# Allegro board 980K2-260817_261117-1.brd

Outline 419.1 x 474.98 mm; copper layers: TOP, L02_GND, L03_DP, L04_GND, L05_DP, L06_GND, L07_VI, L08_GND, L09_VI, L10_GND, L11_VI, L12_GND, L13_VI, L14_GND, L15_5V, L16_5V, L17_C-BIT, L18_C-BIT, L19_GND, L20_VI, L21_GND, L22_VI, L23_GND, L24_VI, L25_GND, L26_VI, L27_GND, L28_DP, L29_GND, L30_DP, L31_GND, BOTTOM. Coordinates in mm from the lower left corner of the outline.

## Placement (name value [footprint] x y rotation side)
BC9  0.1U-50-X-S4-TDK  [C0402]  86.11 107.82 180 bottom
BR5  1K-1-S4  [R0402]  86.11 106.3 0 bottom
BR6  1K-1-S4  [R0402]  86.11 103.5 0 bottom
BR7  0-5-S6  [R0603]  83.44 106.3 180 bottom
BR8  0-5-S4  [R0402]  86.11 105.03 180 bottom
BR9  0-5-S4  [R0402]  86.11 102.24 180 bottom
BU1  AT24C512C-SSHM-T-SOIC8  [SO8_206X127MM]  91.06 105.66 180 bottom
C48  0.01U-100-X7R-S6-MU  [C0603]  147.57 273.87 90 bottom
C49  0.01U-100-X7R-S6-MU  [C0603]  136.27 268.99 270 bottom
C50  0.01U-100-X7R-S6-MU  [C0603]  142.28 268.54 270 bottom
C53  1U-16-X5R-S4-YA  [C0402]  142.24 261.62 270 bottom
C54  2.2U-16-X-S4-MU  [C0402]  136.53 261.62 270 bottom
C58  1U-16-X5R-S4-YA  [C0402]  142.11 257.68 270 bottom
C59  4.7U-100-X-SB-MU  [C1210]  140.59 246.51 270 bottom
C60  0.01U-100-X7R-S6-MU  [C0603]  147.01 259.72 0 bottom
C61  0.01U-100-X7R-S6-MU  [C0603]  156.88 264.78 180 bottom
C62  2.2U-16-X-S4-MU  [C0402]  157.07 259.72 0 bottom
C63  0.01U-100-X7R-S6-MU  [C0603]  157.73 261.82 90 bottom
C64  0.01U-100-X7R-S6-MU  [C0603]  156.88 267.82 180 bottom
C65  0.1U-25-X7R-S4-MU  [C0402]  157.73 271.37 90 bottom
C66  0.1U-25-X7R-S4-MU  [C0402]  152.65 276.61 180 bottom
C67  0.1U-25-X7R-S4-MU  [C0402]  150.24 278.13 180 bottom
C68  0.1U-25-X7R-S4-MU  [C0402]  147.83 282.7 180 bottom
C69  0.01U-100-X7R-S6-MU  [C0603]  151.96 259.72 0 bottom
C70  0.1U-25-X7R-S4-MU  [C0402]  122.8 294.89 180 bottom
C71  0.1U-25-X7R-S4-MU  [C0402]  129.42 294.89 180 bottom
C72  0.1U-25-X7R-S4-MU  [C0402]  158.75 227.33 0 bottom
C73  0.1U-25-X7R-S4-MU  [C0402]  153.67 227.33 0 bottom
C74  0.1U-25-X7R-S4-MU  [C0402]  157.73 273.91 90 bottom
CT1  47U-16-X5R-SB-MU  [C1210]  88.14 153.16 180 bottom
CT2  10U-16-X5R-S8-TY  [C0805]  108.2 164.59 90 bottom
CT3  22U-16-X-S8-MU  [C0805]  110.49 164.59 90 bottom
CT7  47U-16-X5R-SB-MU  [C1210]  88.14 132.84 180 bottom
CT8  10U-16-X5R-S8-TY  [C0805]  110.49 144.27 90 bottom
CT9  22U-16-X-S8-MU  [C0805]  108.2 144.27 90 bottom
F1  C1F8-0.25A-SA  [FUSE_1206_H1P05MM]  88.14 156.72 0 bottom
F2  C1F8-0.25A-SA  [FUSE_1206_H1P05MM]  88.14 136.4 0 bottom
FD1  -  [FD_040_V2]  95.25 123.19 0 top
FD2  -  [FD_040_V2]  323.85 123.19 0 top
FD3  -  [FD_040_V2]  323.85 351.79 0 top
FD4  -  [FD_040_V2]  95.25 351.79 0 top
FD5  -  [FD_040_V2]  323.85 123.19 180 bottom
FD6  -  [FD_040_V2]  95.25 123.19 180 bottom
FD7  -  [FD_040_V2]  95.25 351.79 180 bottom
FD8  -  [FD_040_V2]  323.85 351.79 180 bottom
FD9  -  [FD_040_V2]  19.05 123.19 0 top
FD10  -  [FD_040_V2]  400.05 123.19 0 top
FD11  -  [FD_040_V2]  400.05 351.79 0 top
FD12  -  [FD_040_V2]  19.05 351.79 0 top
FD13  -  [FD_040_V2]  400.05 123.19 180 bottom
FD14  -  [FD_040_V2]  19.05 123.19 180 bottom
FD15  -  [FD_040_V2]  19.05 351.79 180 bottom
FD16  -  [FD_040_V2]  400.05 351.79 180 bottom
K1  UA2-5NJ-A-V3  [RL_NECUA2_5V_V3]  138.43 290.63 270 bottom
K2  G3VM-201DR  [RL_G3VM201DR_200V]  144.15 277.5 0 bottom
K3  G3VM-201DR  [RL_G3VM201DR_200V]  134.49 273.18 90 bottom
K4  G3VM-201DR  [RL_G3VM201DR_200V]  144.15 291.47 0 bottom
K5  G3VM-51UR-5V-VSON4  [RL_G3VM_4P_VSON4]  139.95 268.99 0 bottom
K6  G3VM-51UR-5V-VSON4  [RL_G3VM_4P_VSON4]  139.95 266.19 0 bottom
K7  G3VM-51UR-5V-VSON4  [RL_G3VM_4P_VSON4]  139.95 264.16 0 bottom
K8  G3VM-51UR-5V-VSON4  [RL_G3VM_4P_VSON4]  139.95 261.62 0 bottom
K9  G3VM-51UR-5V-VSON4  [RL_G3VM_4P_VSON4]  134.24 261.62 0 bottom
K10  G3VM-51UR-5V-VSON4  [RL_G3VM_4P_VSON4]  135.38 264.16 0 bottom
K11  G3VM-51UR-5V-VSON4  [RL_G3VM_4P_VSON4]  143.76 257.3 90 bottom
K12  G3VM-51UR-5V-VSON4  [RL_G3VM_4P_VSON4]  143.76 252.48 90 bottom
K13  G3VM-51UR-5V-VSON4  [RL_G3VM_4P_VSON4]  143.76 246.51 90 bottom
K14  G3VM-51UR-5V-VSON4  [RL_G3VM_4P_VSON4]  146.56 252.48 90 bottom
K15  UA2-5NJ-A-V3  [RL_NECUA2_5V_V3]  135.25 242.75 270 bottom
K16  G3VM-51UR-5V-VSON4  [RL_G3VM_4P_VSON4]  146.56 257.3 90 bottom
K17  G3VM-51UR-5V-VSON4  [RL_G3VM_4P_VSON4]  148.72 257.3 90 bottom
K18  G3VM-51UR-5V-VSON4  [RL_G3VM_4P_VSON4]  148.72 252.48 90 bottom
K19  G3VM-51UR-5V-VSON4  [RL_G3VM_4P_VSON4]  151.51 257.3 90 bottom
K20  G3VM-51UR-5V-VSON4  [RL_G3VM_4P_VSON4]  151.51 252.48 90 bottom
K21  G3VM-51UR-5V-VSON4  [RL_G3VM_4P_VSON4]  153.67 257.3 90 bottom
K22  G3VM-51UR-5V-VSON4  [RL_G3VM_4P_VSON4]  153.67 252.48 90 bottom
K23  UA2-5NJ-A-V3  [RL_NECUA2_5V_V3]  152.78 242.75 270 bottom
K24  UA2-5NJ-A-V3  [RL_NECUA2_5V_V3]  161.04 242.75 270 bottom
K25  G3VM-51UR-5V-VSON4  [RL_G3VM_4P_VSON4]  156.97 257.3 90 bottom
K26  G3VM-51UR-5V-VSON4  [RL_G3VM_4P_VSON4]  156.97 252.48 90 bottom
K27  G3VM-51UR-5V-VSON4  [RL_G3VM_4P_VSON4]  160.15 261.37 180 bottom
K28  G3VM-51UR-5V-VSON4  [RL_G3VM_4P_VSON4]  164.72 261.37 180 bottom
K29  G3VM-51UR-5V-VSON4  [RL_G3VM_4P_VSON4]  169.29 261.37 180 bottom
K30  G3VM-51UR-5V-VSON4  [RL_G3VM_4P_VSON4]  160.15 265.18 180 bottom
K31  G3VM-51UR-5V-VSON4  [RL_G3VM_4P_VSON4]  164.72 265.18 180 bottom
K32  G3VM-51UR-5V-VSON4  [RL_G3VM_4P_VSON4]  169.29 265.18 180 bottom
K33  G3VM-51UR-5V-VSON4  [RL_G3VM_4P_VSON4]  160.15 268.22 180 bottom
K34  G3VM-51UR-5V-VSON4  [RL_G3VM_4P_VSON4]  164.72 268.22 180 bottom
K35  G3VM-51UR-5V-VSON4  [RL_G3VM_4P_VSON4]  169.29 268.22 180 bottom
K36  G3VM-51UR-5V-VSON4  [RL_G3VM_4P_VSON4]  160.15 271.27 180 bottom
K37  G3VM-51UR-5V-VSON4  [RL_G3VM_4P_VSON4]  164.72 271.27 180 bottom
K38  G3VM-51UR-5V-VSON4  [RL_G3VM_4P_VSON4]  160.15 273.81 180 bottom
K39  G3VM-51UR-5V-VSON4  [RL_G3VM_4P_VSON4]  164.72 273.81 180 bottom
K40  G3VM-51UR-5V-VSON4  [RL_G3VM_4P_VSON4]  155.58 273.05 270 bottom
K41  G3VM-51UR-5V-VSON4  [RL_G3VM_4P_VSON4]  155.58 277.62 270 bottom
K42  G3VM-51UR-5V-VSON4  [RL_G3VM_4P_VSON4]  155.58 282.19 270 bottom
K43  G3VM-51UR-5V-VSON4  [RL_G3VM_4P_VSON4]  152.65 273.05 270 bottom
K44  G3VM-51UR-5V-VSON4  [RL_G3VM_4P_VSON4]  152.65 278.89 270 bottom
K45  G3VM-51UR-5V-VSON4  [RL_G3VM_4P_VSON4]  152.65 283.46 270 bottom
K46  G3VM-51UR-5V-VSON4  [RL_G3VM_4P_VSON4]  150.24 274.57 270 bottom
K47  G3VM-51UR-5V-VSON4  [RL_G3VM_4P_VSON4]  150.24 280.42 270 bottom
K48  G3VM-51UR-5V-VSON4  [RL_G3VM_4P_VSON4]  150.24 284.99 270 bottom
K49  G3VM-51UR-5V-VSON4  [RL_G3VM_4P_VSON4]  147.83 284.99 270 bottom
K50  G3VM-51UR-5V-VSON4  [RL_G3VM_4P_VSON4]  147.83 279.15 270 bottom
K51  G3VM-51UR-5V-VSON4  [RL_G3VM_4P_VSON4]  148.72 246.51 270 bottom
K52  G3VM-51UR-5V-VSON4  [RL_G3VM_4P_VSON4]  148.72 241.17 90 bottom
K53  G3VM-51UR-5V-VSON4  [RL_G3VM_4P_VSON4]  156.97 246.51 270 bottom
K54  G3VM-51UR-5V-VSON4  [RL_G3VM_4P_VSON4]  156.97 241.17 90 bottom
K55  G3VM-51UR-5V-VSON4  [RL_G3VM_4P_VSON4]  123.44 292.35 0 bottom
K56  G3VM-201DR  [RL_G3VM201DR_200V]  128.4 288.67 90 bottom
K57  G3VM-51UR-5V-VSON4  [RL_G3VM_4P_VSON4]  158.12 234.57 270 bottom
K58  G3VM-51UR-5V-VSON4  [RL_G3VM_4P_VSON4]  156.08 234.57 270 bottom
K59  G3VM-51UR-5V-VSON4  [RL_G3VM_4P_VSON4]  153.04 234.57 270 bottom
K60  G3VM-51UR-5V-VSON4  [RL_G3VM_4P_VSON4]  151 234.57 270 bottom
K61  G3VM-51UR-5V-VSON4  [RL_G3VM_4P_VSON4]  130.05 292.35 0 bottom
LD1  LDG-2-S6  [LED_0603]  88.91 165.19 0 top
LD3  LDG-2-S6  [LED_0603]  88.91 144.87 0 top
LT1  L10U-16A-S16.5X15.5-PU  [IND_16P5X15P5MM]  98.93 156.59 0 bottom
LT3  L10U-16A-S16.5X15.5-PU  [IND_16P5X15P5MM]  98.93 136.27 0 bottom
M1  PG_LTXDX_F_X1_OUTLINE_TD_V2  [PG_LTXDX_F_X1_OUTLINE_TD_COHU]  209.55 237.49 0 top
NOREF  -  []  239.27 200.97 90 top
NOREF#2  -  []  139.08 208.59 0 top
NOREF#3  -  []  234.33 207.37 90 top
NOREF#4  -  []  276.1 280.99 90 top
NOREF#5  -  []  155.97 21.69 90 top
NOREF#6  -  []  204.95 264.23 90 top
NOREF#7  -  []  233.6 276.55 0 top
NOREF#8  -  []  253.62 289.09 90 top
NOREF#9  -  []  237.92 250.01 0 top
NOREF#10  -  []  248.42 204.78 90 top
NOREF#11  -  []  193.18 217.69 90 top
NOREF#12  -  []  148.78 228.49 0 top
NOREF#13  -  []  265.09 257.49 90 top
NOREF#14  -  []  147.43 224.11 90 top
NOREF#15  -  []  132.55 250.49 90 top
NOREF#16  -  []  201.75 266.13 0 top
NOREF#17  -  []  232.63 233.69 0 top
NOREF#18  -  []  273.39 193.03 90 top
NOREF#19  -  []  226.96 251.6 90 top
NOREF#20  -  []  199.27 274.21 0 top
NOREF#21  -  []  239.22 179.57 90 top
NOREF#22  -  []  230.97 195.7 90 top
NOREF#23  -  []  251.21 294.24 90 top
NOREF#24  -  []  189.72 286.19 0 top
NOREF#25  -  []  269.84 284.11 0 top
NOREF#26  -  []  236.57 242.05 0 top
NOREF#27  -  []  148.99 180.62 0 top
NOREF#28  -  []  201.75 209.17 0 top
NOREF#29  -  []  191.87 396.29 0 top
NOREF#30  -  []  276.57 242.05 0 top
NOREF#31  -  []  189.84 219.54 90 top
NOREF#32  -  []  218.83 292.23 0 top
NOREF#33  -  []  192.25 212.18 90 top
NOREF#34  -  []  122.85 237.22 0 top
NOREF#35  -  []  226.16 200.17 90 top
NOREF#36  -  []  233.76 190.88 90 top
NOREF#37  -  []  267.43 218.27 90 top
NOREF#38  -  []  189.84 213.7 0 top
NOREF#39  -  []  192.25 218.02 90 top
NOREF#40  -  []  206.32 272.22 0 top
NOREF#41  -  []  275.68 233.69 90 top
NOREF#42  -  []  239.65 212.56 0 top
NOREF#43  -  []  184.04 251.93 0 top
NOREF#44  -  []  254.09 264.23 90 top
NOREF#45  -  []  193.03 172.1 0 top
NOREF#46  -  []  228.32 245.63 90 top
NOREF#47  -  []  189.72 226.19 0 top
NOREF#48  -  []  204.95 260.42 90 top
NOREF#49  -  []  185.61 257.6 0 top
NOREF#50  -  []  188.99 191.93 0 top
NOREF#51  -  []  148.32 258.18 0 top
NOREF#52  -  []  273.83 172.21 90 top
NOREF#53  -  []  170.89 202.32 0 top
NOREF#54  -  []  273.18 282.26 90 top
NOREF#55  -  []  132.26 248.4 0 top
NOREF#56  -  []  171.22 234.89 90 top
NOREF#57  -  []  233.27 198.18 0 top
NOREF#58  -  []  268.99 180.62 0 top
NOREF#59  -  []  157.8 14.59 90 top
NOREF#60  -  []  208.42 204.78 90 top
NOREF#61  -  []  197.25 251.93 0 top
NOREF#62  -  []  149.29 282.02 90 top
NOREF#63  -  []  173.62 229.09 90 top
NOREF#64  -  []  233.18 222.26 90 top
NOREF#65  -  []  151.98 226.59 90 top
NOREF#66  -  []  187.05 209.24 0 top
NOREF#67  -  []  199.24 244.35 0 top
NOREF#68  -  []  235.15 236.17 90 top
NOREF#69  -  []  261.59 248.12 0 top
NOREF#70  -  []  248.42 261.77 0 top
NOREF#71  -  []  244.64 241.15 90 top
NOREF#72  -  []  253.64 299.09 0 top
NOREF#73  -  []  243.4 236.38 0 top
NOREF#74  -  []  180.95 261.55 90 top
NOREF#75  -  []  260.43 284.38 90 top
NOREF#76  -  []  192.51 235.77 0 top
NOREF#77  -  []  210.02 214.45 0 top
NOREF#78  -  []  239.44 179.15 0 top
NOREF#79  -  []  204.95 272.86 90 top
NOREF#80  -  []  218.95 266.12 0 top
NOREF#81  -  []  228.19 187.71 0 top
NOREF#82  -  []  181.94 389.27 90 top
NOREF#83  -  []  109.54 14.59 90 top
NOREF#84  -  []  230.48 175.77 0 top
NOREF#85  -  []  288.39 396.29 0 top
NOREF#86  -  []  150.77 223.79 90 top
NOREF#87  -  []  149.24 185.31 90 top
NOREF#88  -  []  146.28 193.03 90 top
NOREF#89  -  []  153.95 251.93 0 top
NOREF#90  -  []  179.08 201.22 0 top
NOREF#91  -  []  249.05 232.28 0 top
NOREF#92  -  []  228.78 244.35 0 top
NOREF#93  -  []  182.87 213.02 0 top
NOREF#94  -  []  149.84 279.54 90 top
NOREF#95  -  []  274.07 251.6 90 top
NOREF#96  -  []  221.03 267.69 90 top
NOREF#97  -  []  205.38 226.23 0 top
NOREF#98  -  []  178.85 241.15 90 top
NOREF#99  -  []  171.25 244.35 0 top
NOREF#100  -  []  146.43 222.5 90 top
NOREF#101  -  []  278.13 389.27 90 top
NOREF#102  -  []  148.19 247.71 0 top
NOREF#103  -  []  151.7 274.65 90 top
NOREF#104  -  []  323.77 454.29 90 top
NOREF#105  -  []  230.56 252.78 0 top
NOREF#106  -  []  135.15 265.24 90 top
NOREF#107  -  []  211.05 185.49 90 top
NOREF#108  -  []  180.83 263.76 90 top
NOREF#109  -  []  196.52 221.12 0 top
NOREF#110  -  []  198.47 82.65 0 top
NOREF#111  -  []  191.19 223.92 0 top
NOREF#112  -  []  254.09 267.27 90 top
NOREF#113  -  []  243.84 205.58 0 top
NOREF#114  -  []  233.83 232.21 90 top
NOREF#115  -  []  263.36 258.18 0 top
NOREF#116  -  []  162.2 178.35 0 top
NOREF#117  -  []  180.95 208.91 90 top
NOREF#118  -  []  243.84 264.78 90 top
NOREF#119  -  []  254.09 200.42 90 top
NOREF#120  -  []  148.44 257.85 90 top
NOREF#121  -  []  187.43 284.11 90 top
NOREF#122  -  []  231.53 233.37 90 top
NOREF#123  -  []  141.55 205.11 90 top
NOREF#124  -  []  231.24 197.85 90 top
NOREF#125  -  []  242.44 232.28 0 top
NOREF#126  -  []  226.16 286.14 90 top
NOREF#127  -  []  278.64 173.37 90 top
NOREF#128  -  []  268.78 244.35 0 top
NOREF#129  -  []  191.79 191.93 0 top
NOREF#130  -  []  146.28 197.85 90 top
NOREF#131  -  []  159.4 207.5 90 top
NOREF#132  -  []  288.42 208.62 0 top
NOREF#133  -  []  269.72 221.62 0 top
NOREF#134  -  []  264.16 191.6 90 top
NOREF#135  -  []  157.92 190.01 0 top
NOREF#136  -  []  163.84 268.62 0 top
NOREF#137  -  []  147.05 269.24 0 top
NOREF#138  -  []  178.95 266.12 0 top
NOREF#139  -  []  155.17 216.75 90 top
NOREF#140  -  []  302.26 14.59 90 top
NOREF#141  -  []  149.72 275.77 0 top
NOREF#142  -  []  189.84 279.54 90 top
NOREF#143  -  []  155.17 221.32 0 top
NOREF#144  -  []  250.89 269.17 0 top
NOREF#145  -  []  216.98 205.11 90 top
NOREF#146  -  []  218.35 207.01 0 top
NOREF#147  -  []  183.36 253.35 0 top
NOREF#148  -  []  279.24 184.35 0 top
NOREF#149  -  []  170.92 231.95 90 top
NOREF#150  -  []  203.84 207.82 90 top
NOREF#151  -  []  197.59 235.77 0 top
NOREF#152  -  []  276.1 276.42 90 top
NOREF#153  -  []  185.09 197.49 90 top
NOREF#154  -  []  166.32 262.32 0 top
NOREF#155  -  []  235.68 173.69 90 top
NOREF#156  -  []  268.44 257.85 90 top
NOREF#157  -  []  229.72 215.77 0 top
NOREF#158  -  []  261.59 294.14 0 top
NOREF#159  -  []  238.91 232.21 90 top
NOREF#160  -  []  236.33 167.9 90 top
NOREF#161  -  []  289.52 267.27 90 top
NOREF#162  -  []  159.4 200.64 90 top
NOREF#163  -  []  142.88 273.02 0 top
NOREF#164  -  []  149.29 289.79 0 top
NOREF#165  -  []  228.78 184.35 0 top
NOREF#166  -  []  139.55 240.49 90 top
NOREF#167  -  []  230.6 173.69 0 top
NOREF#168  -  []  275.15 236.17 90 top
NOREF#169  -  []  191.11 200.17 90 top
NOREF#170  -  []  243.84 210.87 90 top
NOREF#171  -  []  229.12 251.6 90 top
NOREF#172  -  []  197.71 233.69 0 top
NOREF#173  -  []  226.01 190.88 90 top
NOREF#174  -  []  177.25 236.5 90 top
NOREF#175  -  []  157.92 236.37 90 top
NOREF#176  -  []  143.49 253.03 90 top
NOREF#177  -  []  88.14 155.19 0 top
NOREF#178  -  []  231.24 253.03 90 top
NOREF#179  -  []  196.33 227.9 90 top
NOREF#180  -  []  277.25 196.75 0 top
NOREF#181  -  []  191.46 167 0 top
NOREF#182  -  []  192.25 212.18 0 top
NOREF#183  -  []  270.6 233.69 0 top
NOREF#184  -  []  197.37 251.6 90 top
NOREF#185  -  []  212.55 284.49 0 top
NOREF#186  -  []  224.16 251.6 90 top
NOREF#187  -  []  193.6 286.96 0 top
NOREF#188  -  []  198.91 172.21 90 top
NOREF#189  -  []  259.08 208.59 0 top
NOREF#190  -  []  135.15 268.04 90 top
NOREF#191  -  []  244.95 260.42 90 top
NOREF#192  -  []  261.85 292.49 0 top
NOREF#193  -  []  277.71 233.69 0 top
NOREF#194  -  []  197.59 175.77 0 top
NOREF#195  -  []  220.83 203.76 90 top
NOREF#196  -  []  225.61 197.6 0 top
NOREF#197  -  []  218.95 208.91 0 top
NOREF#198  -  []  136.5 285.91 90 top
NOREF#199  -  []  266.96 196.43 90 top
NOREF#200  -  []  161.12 188.11 90 top
NOREF#201  -  []  267.05 269.24 0 top
NOREF#202  -  []  209.55 237.49 0 top
NOREF#203  -  []  193.76 190.88 90 top
NOREF#204  -  []  275.17 276.75 0 top
NOREF#205  -  []  244.61 234.24 90 top
NOREF#206  -  []  253.62 229.09 90 top
NOREF#207  -  []  279.27 201.77 0 top
NOREF#208  -  []  276.52 221.12 0 top
NOREF#209  -  []  232.72 257.6 0 top
NOREF#210  -  []  237.37 191.6 90 top
NOREF#211  -  []  293.02 392.33 90 top
NOREF#212  -  []  221.59 308.11 0 top
NOREF#213  -  []  237.04 244.35 0 top
NOREF#214  -  []  186.01 195.7 90 top
NOREF#215  -  []  226.16 260.17 90 top
NOREF#216  -  []  264.24 18.69 0 top
NOREF#217  -  []  235.58 202.67 90 top
NOREF#218  -  []  191.79 196.75 0 top
NOREF#219  -  []  186.16 200.17 90 top
NOREF#220  -  []  270.6 233.69 90 top
NOREF#221  -  []  195.58 202.67 90 top
NOREF#222  -  []  215.24 261.55 90 top
NOREF#223  -  []  194.39 222.02 90 top
NOREF#224  -  []  228.32 198.18 0 top
NOREF#225  -  []  154.07 191.6 90 top
NOREF#226  -  []  188.99 180.62 0 top
NOREF#227  -  []  170.89 269.17 0 top
NOREF#228  -  []  139.08 263.76 0 top
NOREF#229  -  []  124.55 148.49 90 top
NOREF#230  -  []  279.4 208.95 0 top
NOREF#231  -  []  156.7 193.03 90 top
NOREF#232  -  []  227.43 278.27 0 top
NOREF#233  -  []  192.13 280.09 0 top
NOREF#234  -  []  156.57 185.63 90 top
NOREF#235  -  []  130.58 263.21 0 top
NOREF#236  -  []  235.96 168.6 90 top
NOREF#237  -  []  269.67 190.01 0 top
NOREF#238  -  []  318.12 17.15 0 top
NOREF#239  -  []  235.17 276.75 90 top
NOREF#240  -  []  149.12 196.43 90 top
NOREF#241  -  []  258.35 267.01 0 top
NOREF#242  -  []  164.95 260.42 90 top
NOREF#243  -  []  170.89 206.13 0 top
NOREF#244  -  []  168.42 267.82 90 top
NOREF#245  -  []  149.84 273.7 0 top
NOREF#246  -  []  188.32 258.18 0 top
NOREF#247  -  []  243.97 212 0 top
NOREF#248  -  []  245.73 17.15 90 top
NOREF#249  -  []  251.05 232.28 90 top
NOREF#250  -  []  156.1 216.42 90 top
NOREF#251  -  []  273.98 238.07 0 top
NOREF#252  -  []  227.8 265.39 90 top
NOREF#253  -  []  236.52 221.12 0 top
NOREF#254  -  []  238.11 232.1 0 top
NOREF#255  -  []  243.84 274.21 0 top
NOREF#256  -  []  191.76 167.33 0 top
NOREF#257  -  []  141.55 202.57 90 top
NOREF#258  -  []  222.81 186.81 0 top
NOREF#259  -  []  199.27 264.78 90 top
NOREF#260  -  []  230.56 192.78 0 top
NOREF#261  -  []  233.03 172.1 0 top
NOREF#262  -  []  174.04 210.63 90 top
NOREF#263  -  []  144.04 191.93 0 top
NOREF#264  -  []  258.35 204.47 0 top
NOREF#265  -  []  260.83 261.22 90 top
NOREF#266  -  []  192.13 220.09 0 top
NOREF#267  -  []  187.8 209.99 0 top
NOREF#268  -  []  229.84 213.7 0 top
NOREF#269  -  []  218.83 232.23 0 top
NOREF#270  -  []  152.51 175.77 0 top
NOREF#271  -  []  268.99 251.93 0 top
NOREF#272  -  []  136.5 285.91 0 top
NOREF#273  -  []  226.7 283.04 90 top
NOREF#274  -  []  141.6 248.12 0 top
NOREF#275  -  []  148.35 277.95 90 top
NOREF#276  -  []  277.25 191.93 0 top
NOREF#277  -  []  148.81 190.88 90 top
NOREF#278  -  []  150.97 195.7 90 top
NOREF#279  -  []  151.7 277.85 0 top
NOREF#280  -  []  149.12 180.3 90 top
NOREF#281  -  []  227.77 197.6 0 top
NOREF#282  -  []  214.09 260.42 90 top
NOREF#283  -  []  231.98 226.59 90 top
NOREF#284  -  []  243.84 261.77 0 top
NOREF#285  -  []  152.25 212.18 90 top
NOREF#286  -  []  191.98 286.59 90 top
NOREF#287  -  []  274.07 196.43 90 top
NOREF#288  -  []  122.44 292.28 0 top
NOREF#289  -  []  123.92 229.94 0 top
NOREF#290  -  []  149.84 224.11 90 top
NOREF#291  -  []  235.49 168.7 90 top
NOREF#292  -  []  237.37 256.43 90 top
NOREF#293  -  []  231.98 286.59 90 top
NOREF#294  -  []  231.73 232.54 0 top
NOREF#295  -  []  188.32 198.18 0 top
NOREF#296  -  []  265.41 213.02 90 top
NOREF#297  -  []  228.44 253.03 90 top
NOREF#298  -  []  243.97 213.09 90 top
NOREF#299  -  []  186.16 272.17 90 top
NOREF#300  -  []  261.59 234.15 0 top
NOREF#301  -  []  230.97 190.88 90 top
NOREF#302  -  []  172.55 224.49 0 top
NOREF#303  -  []  190.77 223.79 90 top
NOREF#304  -  []  283.84 271.67 0 top
NOREF#305  -  []  237.03 238.07 0 top
NOREF#306  -  []  155.68 233.69 90 top
NOREF#307  -  []  78.11 0 90 top
NOREF#308  -  []  267.9 205.84 90 top
NOREF#309  -  []  159.72 219.22 90 top
NOREF#310  -  []  179.73 238.35 0 top
NOREF#311  -  []  150.77 219.22 90 top
NOREF#312  -  []  151.7 280.49 90 top
NOREF#313  -  []  261.55 267.14 90 top
NOREF#314  -  []  178.95 261.55 0 top
NOREF#315  -  []  261.85 232.5 0 top
NOREF#316  -  []  251.25 244.35 0 top
NOREF#317  -  []  148.32 198.18 0 top
NOREF#318  -  []  148.32 193.35 0 top
NOREF#319  -  []  237.18 236.17 90 top
NOREF#320  -  []  208.42 208.62 0 top
NOREF#321  -  []  262.87 226.99 0 top
NOREF#322  -  []  256.83 227.03 0 top
NOREF#323  -  []  225.41 286.99 90 top
NOREF#324  -  []  272.63 233.69 90 top
NOREF#325  -  []  196.7 181.72 90 top
NOREF#326  -  []  151.53 173.37 90 top
NOREF#327  -  []  196.61 233.37 90 top
NOREF#328  -  []  159.4 265.9 0 top
NOREF#329  -  []  233.76 255.7 90 top
NOREF#330  -  []  210.89 266.13 0 top
NOREF#331  -  []  159.4 272 0 top
NOREF#332  -  []  178.35 209.04 0 top
NOREF#333  -  []  248.54 200.64 90 top
NOREF#334  -  []  281.75 269.17 0 top
NOREF#335  -  []  85.59 155.57 90 top
NOREF#336  -  []  189.84 224.11 90 top
NOREF#337  -  []  142.03 289.03 90 top
NOREF#338  -  []  205.74 14.59 90 top
NOREF#339  -  []  230.77 223.79 90 top
NOREF#340  -  []  176.74 456.29 0 top
NOREF#341  -  []  132.87 287.4 90 top
NOREF#342  -  []  272.63 173.69 90 top
NOREF#343  -  []  236.57 185.63 90 top
NOREF#344  -  []  268.32 242.05 0 top
NOREF#345  -  []  229.12 256.43 90 top
NOREF#346  -  []  88.44 105.03 90 top
NOREF#347  -  []  129.49 266.31 0 top
NOREF#348  -  []  180.95 206.12 90 top
NOREF#349  -  []  147.77 197.6 0 top
NOREF#350  -  []  263.49 257.85 90 top
NOREF#351  -  []  144.71 241.71 90 top
NOREF#352  -  []  124.61 234.24 90 top
NOREF#353  -  []  268.35 217.95 90 top
NOREF#354  -  []  281.75 214.76 0 top
NOREF#355  -  []  215.84 202.57 90 top
NOREF#356  -  []  263.89 185.24 90 top
NOREF#357  -  []  138.83 232.23 0 top
NOREF#358  -  []  181.03 267.69 90 top
NOREF#359  -  []  193.76 250.88 90 top
NOREF#360  -  []  235.92 195.7 90 top
NOREF#361  -  []  197.04 184.35 0 top
NOREF#362  -  []  276.8 280.49 90 top
NOREF#363  -  []  271.73 232.54 0 top
NOREF#364  -  []  157.71 233.69 0 top
NOREF#365  -  []  135.15 268.04 0 top
NOREF#366  -  []  220.59 244.98 90 top
NOREF#367  -  []  153.56 233.37 90 top
NOREF#368  -  []  197.18 176.17 90 top
NOREF#369  -  []  238.64 173.37 90 top
NOREF#370  -  []  156.8 214.65 90 top
NOREF#371  -  []  232.87 188.11 90 top
NOREF#372  -  []  234.78 176.5 90 top
NOREF#373  -  []  283.84 268.62 0 top
NOREF#374  -  []  237.18 176.17 90 top
NOREF#375  -  []  164.61 234.24 90 top
NOREF#376  -  []  237.37 180.3 90 top
NOREF#377  -  []  147.9 265.84 90 top
NOREF#378  -  []  150.15 206.89 90 top
NOREF#379  -  []  14.6 372.12 0 top
NOREF#380  -  []  268.78 288.49 0 top
NOREF#381  -  []  213.45 184.35 0 top
NOREF#382  -  []  195.17 272.17 90 top
NOREF#383  -  []  288.42 267.82 90 top
NOREF#384  -  []  196.7 257.85 90 top
NOREF#385  -  []  88.16 165.19 0 top
NOREF#386  -  []  208.94 221.73 0 top
NOREF#387  -  []  168.54 208.95 0 top
NOREF#388  -  []  236.02 197.6 0 top
NOREF#389  -  []  264.16 245.63 90 top
NOREF#390  -  []  196.1 211.85 90 top
NOREF#391  -  []  237.03 178.07 0 top
NOREF#392  -  []  217.25 176.5 90 top
NOREF#393  -  []  195.17 221.32 90 top
NOREF#394  -  []  279.4 264.45 90 top
NOREF#395  -  []  138.56 246.51 0 top
NOREF#396  -  []  183.36 247.38 0 top
NOREF#397  -  []  157.28 264.37 0 top
NOREF#398  -  []  239.72 279.22 90 top
NOREF#399  -  []  104.35 456.29 0 top
NOREF#400  -  []  197.71 172.86 0 top
NOREF#401  -  []  213.78 267.01 0 top
NOREF#402  -  []  88.44 106.3 90 top
NOREF#403  -  []  211.21 294.89 90 top
NOREF#404  -  []  136.98 205.11 90 top
NOREF#405  -  []  241.75 272.22 0 top
NOREF#406  -  []  228.78 244.35 0 top
NOREF#407  -  []  197.37 240.3 90 top
NOREF#408  -  []  263.36 198.18 0 top
NOREF#409  -  []  276.52 276.55 0 top
NOREF#410  -  []  264.26 396.29 0 top
NOREF#411  -  []  279.27 200.97 90 top
NOREF#412  -  []  155.17 272.17 90 top
NOREF#413  -  []  95.33 18.69 0 top
NOREF#414  -  []  208.54 204.45 90 top
NOREF#415  -  []  156.02 181.47 0 top
NOREF#416  -  []  85.59 135.25 90 top
NOREF#417  -  []  135.15 265.24 0 top
NOREF#418  -  []  263.49 253.03 90 top
NOREF#419  -  []  236.54 227 0 top
NOREF#420  -  []  220.95 264.09 90 top
NOREF#421  -  []  150.56 247.68 0 top
NOREF#422  -  []  151.95 238.07 0 top
NOREF#423  -  []  239.27 270.87 90 top
NOREF#424  -  []  233.27 193.35 0 top
NOREF#425  -  []  206.32 212.22 0 top
NOREF#426  -  []  271.19 228.49 0 top
NOREF#427  -  []  189.12 240.3 90 top
NOREF#428  -  []  284.64 241.15 90 top
NOREF#429  -  []  135.66 184.35 0 top
NOREF#430  -  []  194.07 196.43 90 top
NOREF#431  -  []  155.92 195.7 90 top
NOREF#432  -  []  175.24 261.55 90 top
NOREF#433  -  []  203.97 207.5 90 top
NOREF#434  -  []  147.8 265.39 90 top
NOREF#435  -  []  260.59 184.98 90 top
NOREF#436  -  []  193.03 232.1 0 top
NOREF#437  -  []  136.55 194.49 90 top
NOREF#438  -  []  276.57 245.63 90 top
NOREF#439  -  []  189.84 273.7 90 top
NOREF#440  -  []  186.83 256.75 0 top
NOREF#441  -  []  232.25 282.59 0 top
NOREF#442  -  []  239.22 239.57 90 top
NOREF#443  -  []  209.52 204.23 90 top
NOREF#444  -  []  283.97 204.45 90 top
NOREF#445  -  []  277.5 245.31 90 top
NOREF#446  -  []  165.49 452.29 90 top
NOREF#447  -  []  147.43 278.27 90 top
NOREF#448  -  []  268.32 253.35 0 top
NOREF#449  -  []  179.08 208.59 0 top
NOREF#450  -  []  146.88 289.79 0 top
NOREF#451  -  []  192.13 274.25 0 top
NOREF#452  -  []  131.05 289.49 0 top
NOREF#453  -  []  196.81 172.54 0 top
NOREF#454  -  []  190.98 244.35 0 top
NOREF#455  -  []  268.32 182.05 0 top
NOREF#456  -  []  217.25 236.5 90 top
NOREF#457  -  []  148.44 241.72 90 top
NOREF#458  -  []  266.96 256.43 90 top
NOREF#459  -  []  277.04 244.35 0 top
NOREF#460  -  []  236.02 181.47 0 top
NOREF#461  -  []  195.68 173.69 0 top
NOREF#462  -  []  221.55 202.57 90 top
NOREF#463  -  []  246.32 272.22 0 top
NOREF#464  -  []  276.1 220.99 90 top
NOREF#465  -  []  265.42 274.72 90 top
NOREF#466  -  []  283.84 270.87 90 top
NOREF#467  -  []  196.02 197.6 0 top
NOREF#468  -  []  229.84 273.7 0 top
NOREF#469  -  []  256.38 264.09 90 top
NOREF#470  -  []  173.64 299.09 0 top
NOREF#471  -  []  223.49 187.06 90 top
NOREF#472  -  []  143.89 185.24 90 top
NOREF#473  -  []  142.81 247.68 0 top
NOREF#474  -  []  228.44 197.85 90 top
NOREF#475  -  []  251.25 184.35 0 top
NOREF#476  -  []  279.27 273.41 90 top
NOREF#477  -  []  193.18 211.85 90 top
NOREF#478  -  []  226.83 256.75 0 top
NOREF#479  -  []  174.07 270.89 90 top
NOREF#480  -  []  259.08 261.22 0 top
NOREF#481  -  []  209.52 267.27 90 top
NOREF#482  -  []  196.02 192.78 0 top
NOREF#483  -  []  275.58 202.67 90 top
NOREF#484  -  []  262.81 257.6 0 top
NOREF#485  -  []  233.56 233.37 90 top
NOREF#486  -  []  266.16 272.17 90 top
NOREF#487  -  []  244.44 232.28 90 top
NOREF#488  -  []  130.92 231.95 90 top
NOREF#489  -  []  281.41 167.9 90 top
NOREF#490  -  []  229.24 185.31 90 top
NOREF#491  -  []  258.85 181.15 90 top
NOREF#492  -  []  270.88 228.6 90 top
NOREF#493  -  []  220.43 224.38 90 top
NOREF#494  -  []  152.63 233.69 0 top
NOREF#495  -  []  136.5 271.94 0 top
NOREF#496  -  []  258.35 207.01 0 top
NOREF#497  -  []  189.72 215.77 0 top
NOREF#498  -  []  195.15 176.17 90 top
NOREF#499  -  []  248.42 264.78 90 top
NOREF#500  -  []  254.51 263.76 0 top
NOREF#501  -  []  125.08 17.15 0 top
NOREF#502  -  []  147.43 284.11 0 top
NOREF#503  -  []  221.55 209.94 90 top
NOREF#504  -  []  148.78 244.35 0 top
NOREF#505  -  []  214.07 270.89 90 top
NOREF#506  -  []  236.8 285.06 90 top
NOREF#507  -  []  208.42 268.62 0 top
NOREF#508  -  []  231.19 288.49 0 top
NOREF#509  -  []  214.43 292.23 0 top
NOREF#510  -  []  114.61 17.78 0 top
NOREF#511  -  []  141.6 234.15 0 top
NOREF#512  -  []  118.64 291.4 0 top
NOREF#513  -  []  188.99 251.93 0 top
NOREF#514  -  []  182.03 289.03 90 top
NOREF#515  -  []  147.8 204.99 90 top
NOREF#516  -  []  190.88 168.6 90 top
NOREF#517  -  []  140.83 261.22 90 top
NOREF#518  -  []  211.21 234.89 90 top
NOREF#519  -  []  239.27 265.58 0 top
NOREF#520  -  []  273.18 271.85 90 top
NOREF#521  -  []  149.72 286.19 0 top
NOREF#522  -  []  151.11 253.35 0 top
NOREF#523  -  []  267.77 197.6 0 top
NOREF#524  -  []  159.4 210.55 90 top
NOREF#525  -  []  233.76 250.88 90 top
NOREF#526  -  []  163.97 270.55 90 top
NOREF#527  -  []  157.37 240.3 90 top
NOREF#528  -  []  202.57 231.95 0 top
NOREF#529  -  []  312.52 396.29 0 top
NOREF#530  -  []  231.11 258.18 0 top
NOREF#531  -  []  191.11 198.18 0 top
NOREF#532  -  []  239.27 207.82 90 top
NOREF#533  -  []  146.01 184.91 90 top
NOREF#534  -  []  276.8 274.65 90 top
NOREF#535  -  []  279.4 213.09 90 top
NOREF#536  -  []  192.63 173.69 0 top
NOREF#537  -  []  62.86 375.04 0 top
NOREF#538  -  []  228.32 185.63 90 top
NOREF#539  -  []  161.41 167.9 90 top
NOREF#540  -  []  158.91 232.21 90 top
NOREF#541  -  []  148.95 266.89 0 top
NOREF#542  -  []  203.97 260.64 90 top
NOREF#543  -  []  248.54 260.64 90 top
NOREF#544  -  []  273.39 253.03 90 top
NOREF#545  -  []  153.39 253.03 90 top
NOREF#546  -  []  236.57 245.63 0 top
NOREF#547  -  []  232.25 212.18 0 top
NOREF#548  -  []  267.3 280.35 0 top
NOREF#549  -  []  268.89 392.33 90 top
NOREF#550  -  []  146.17 212.17 90 top
NOREF#551  -  []  230.98 184.35 0 top
NOREF#552  -  []  224.04 256.75 0 top
NOREF#553  -  []  233.39 197.85 90 top
NOREF#554  -  []  232.72 252.78 0 top
NOREF#555  -  []  261.59 308.11 0 top
NOREF#556  -  []  176.55 254.49 90 top
NOREF#557  -  []  164.95 212.86 90 top
NOREF#558  -  []  192.87 188.11 90 top
NOREF#559  -  []  239.65 272.56 0 top
NOREF#560  -  []  228.44 241.72 90 top
NOREF#561  -  []  257.25 176.5 90 top
NOREF#562  -  []  229.55 188.99 90 top
NOREF#563  -  []  178.95 264.09 0 top
NOREF#564  -  []  236.57 185.63 0 top
NOREF#565  -  []  239.27 273.41 90 top
NOREF#566  -  []  159.4 204.45 90 top
NOREF#567  -  []  267.77 192.78 0 top
NOREF#568  -  []  205.04 233.3 90 top
NOREF#569  -  []  273.03 232.1 0 top
NOREF#570  -  []  275.68 233.69 0 top
NOREF#571  -  []  163.97 274.54 0 top
NOREF#572  -  []  173.36 201.22 0 top
NOREF#573  -  []  182.81 252.78 0 top
NOREF#574  -  []  273.39 257.85 90 top
NOREF#575  -  []  188.99 240.62 0 top
NOREF#576  -  []  162.44 232.28 0 top
NOREF#577  -  []  203.97 265.9 0 top
NOREF#578  -  []  248.42 260.97 90 top
NOREF#579  -  []  187.43 284.11 0 top
NOREF#580  -  []  156.54 167 0 top
NOREF#581  -  []  143.49 187.06 90 top
NOREF#582  -  []  249.17 231.95 0 top
NOREF#583  -  []  196.02 257.6 0 top
NOREF#584  -  []  204.95 210.32 90 top
NOREF#585  -  []  223.36 193.35 0 top
NOREF#586  -  []  149.84 213.7 90 top
NOREF#587  -  []  258.97 211.91 90 top
NOREF#588  -  []  155.58 202.67 90 top
NOREF#589  -  []  258.35 264.47 0 top
NOREF#590  -  []  181.85 306.46 0 top
NOREF#591  -  []  270.77 213.37 90 top
NOREF#592  -  []  127.95 226.12 90 top
NOREF#593  -  []  233.03 232.1 0 top
NOREF#594  -  []  248.42 208.62 0 top
NOREF#595  -  []  279.22 239.57 90 top
NOREF#596  -  []  149.78 228.3 0 top
NOREF#597  -  []  140.83 203.76 90 top
NOREF#598  -  []  196.02 181.47 0 top
NOREF#599  -  []  156.57 258.18 0 top
NOREF#600  -  []  209.87 389.27 90 top
NOREF#601  -  []  208.54 260.64 90 top
NOREF#602  -  []  209.55 237.49 90 top
NOREF#603  -  []  260.83 205.79 90 top
NOREF#604  -  []  248.54 267.5 90 top
NOREF#605  -  []  144.71 247.68 90 top
NOREF#606  -  []  232.87 248.11 90 top
NOREF#607  -  []  236.45 247.71 0 top
NOREF#608  -  []  243.97 273.09 90 top
NOREF#609  -  []  134.38 204.09 0 top
NOREF#610  -  []  149.55 188.99 90 top
NOREF#611  -  []  171.05 229.49 0 top
NOREF#612  -  []  229.67 190.01 0 top
NOREF#613  -  []  191.19 283.92 0 top
NOREF#614  -  []  236.81 232.54 0 top
NOREF#615  -  []  213.36 201.22 0 top
NOREF#616  -  []  156.02 248.11 90 top
NOREF#617  -  []  148.44 253.03 90 top
NOREF#618  -  []  143.36 187.38 0 top
NOREF#619  -  []  159.4 262.09 0 top
NOREF#620  -  []  171.22 234.24 90 top
NOREF#621  -  []  168.45 295.2 0 top
NOREF#622  -  []  181.6 234.15 0 top
NOREF#623  -  []  193.39 257.85 90 top
NOREF#624  -  []  294.09 200.42 90 top
NOREF#625  -  []  279.72 214.65 90 top
NOREF#626  -  []  146.96 191.6 90 top
NOREF#627  -  []  158.91 172.21 90 top
NOREF#628  -  []  232.25 272.17 0 top
NOREF#629  -  []  235.17 221.32 90 top
NOREF#630  -  []  122.2 178.35 0 top
NOREF#631  -  []  218.95 206.12 0 top
NOREF#632  -  []  138.97 211.91 90 top
NOREF#633  -  []  193.83 232.21 90 top
NOREF#634  -  []  191.24 197.85 90 top
NOREF#635  -  []  283.84 205.58 0 top
NOREF#636  -  []  239.27 205.58 0 top
NOREF#637  -  []  166.32 214.76 0 top
NOREF#638  -  []  135.15 263.21 90 top
NOREF#639  -  []  183.36 187.38 0 top
NOREF#640  -  []  196.57 185.63 90 top
NOREF#641  -  []  186.96 256.43 90 top
NOREF#642  -  []  269.84 213.7 90 top
NOREF#643  -  []  235.68 233.69 90 top
NOREF#644  -  []  261.85 306.46 0 top
NOREF#645  -  []  168.54 267.5 90 top
NOREF#646  -  []  149.84 213.7 0 top
NOREF#647  -  []  172.37 392.33 90 top
NOREF#648  -  []  233.18 271.85 90 top
NOREF#649  -  []  232.25 282.59 90 top
NOREF#650  -  []  228.32 242.05 0 top
NOREF#651  -  []  187.8 269.99 0 top
NOREF#652  -  []  218.97 211.91 90 top
NOREF#653  -  []  163.84 210.87 90 top
NOREF#654  -  []  287.25 19.69 90 top
NOREF#655  -  []  181.85 246.47 0 top
NOREF#656  -  []  231.91 251.6 90 top
NOREF#657  -  []  196.81 232.54 0 top
NOREF#658  -  []  239.4 264.45 90 top
NOREF#659  -  []  220.83 201.22 90 top
NOREF#660  -  []  141.55 207.14 90 top
NOREF#661  -  []  248.42 265.58 0 top
NOREF#662  -  []  268.81 255.7 90 top
NOREF#663  -  []  266.28 197.85 90 top
NOREF#664  -  []  159.72 223.79 90 top
NOREF#665  -  []  149.84 284.11 0 top
NOREF#666  -  []  283.97 267.5 90 top
NOREF#667  -  []  279.22 250.88 90 top
NOREF#668  -  []  139.73 178.35 0 top
NOREF#669  -  []  208.42 260.97 90 top
NOREF#670  -  []  185.09 257.49 90 top
NOREF#671  -  []  272.63 233.69 0 top
NOREF#672  -  []  197.5 185.31 90 top
NOREF#673  -  []  151.24 257.85 90 top
NOREF#674  -  []  188.32 253.35 0 top
NOREF#675  -  []  159.27 264.78 90 top
NOREF#676  -  []  178.35 267.01 0 top
NOREF#677  -  []  194.33 264.33 90 top
NOREF#678  -  []  275.17 221.32 90 top
NOREF#679  -  []  191.95 178.07 0 top
NOREF#680  -  []  133.36 201.22 0 top
NOREF#681  -  []  196.02 241.47 0 top
NOREF#682  -  []  180.95 201.55 90 top
NOREF#683  -  []  228.32 193.35 0 top
NOREF#684  -  []  186.16 253.35 0 top
NOREF#685  -  []  156.02 236.37 0 top
NOREF#686  -  []  233.83 172.21 90 top
NOREF#687  -  []  152.66 166.36 90 top
NOREF#688  -  []  210.92 231.95 90 top
NOREF#689  -  []  202.26 236.17 90 top
NOREF#690  -  []  154.07 196.43 90 top
NOREF#691  -  []  188.78 184.35 0 top
NOREF#692  -  []  155.17 216.75 0 top
NOREF#693  -  []  235.17 276.75 0 top
NOREF#694  -  []  156.79 231.3 0 top
NOREF#695  -  []  271.79 251.93 0 top
NOREF#696  -  []  228.35 277.95 90 top
NOREF#697  -  []  241.41 167.9 90 top
NOREF#698  -  []  275.96 168.6 90 top
NOREF#699  -  []  178.35 211.84 0 top
NOREF#700  -  []  253.45 184.35 0 top
NOREF#701  -  []  219.73 238.35 0 top
NOREF#702  -  []  135.15 260.67 0 top
NOREF#703  -  []  267.77 257.6 0 top
NOREF#704  -  []  275.68 173.69 90 top
NOREF#705  -  []  286.32 202.32 0 top
NOREF#706  -  []  187.77 257.6 0 top
NOREF#707  -  []  218.35 264.47 0 top
NOREF#708  -  []  208.54 200.64 90 top
NOREF#709  -  []  274.39 282.02 90 top
NOREF#710  -  []  239.22 250.88 90 top
NOREF#711  -  []  106.83 148.19 90 top
NOREF#712  -  []  254.51 203.76 0 top
NOREF#713  -  []  222.87 273.02 0 top
NOREF#714  -  []  216.83 227.03 0 top
NOREF#715  -  []  143.36 247.38 0 top
NOREF#716  -  []  131.26 244.35 0 top
NOREF#717  -  []  237.25 191.93 0 top
NOREF#718  -  []  213.36 261.22 0 top
NOREF#719  -  []  139.08 201.22 0 top
NOREF#720  -  []  157.04 244.35 0 top
NOREF#721  -  []  249.52 210.32 90 top
NOREF#722  -  []  276.84 167.33 0 top
NOREF#723  -  []  256.26 203.76 90 top
NOREF#724  -  []  271.24 193.03 90 top
NOREF#725  -  []  244.32 291.95 90 top
NOREF#726  -  []  85.84 137.3 0 top
NOREF#727  -  []  231.19 283.92 0 top
NOREF#728  -  []  246.32 274.76 0 top
NOREF#729  -  []  203.97 268.95 0 top
NOREF#730  -  []  141.55 209.94 90 top
NOREF#731  -  []  255.84 262.57 90 top
NOREF#732  -  []  197.74 226.35 90 top
NOREF#733  -  []  129.44 260.67 0 top
NOREF#734  -  []  94.87 102.74 90 top
NOREF#735  -  []  236.7 197.85 90 top
NOREF#736  -  []  155.68 233.69 0 top
NOREF#737  -  []  281.12 188.11 90 top
NOREF#738  -  []  232.25 218.02 90 top
NOREF#739  -  []  203.84 265.58 0 top
NOREF#740  -  []  172.55 250.49 90 top
NOREF#741  -  []  188.78 288.49 0 top
NOREF#742  -  []  149.12 240.3 90 top
NOREF#743  -  []  273.18 244.35 0 top
NOREF#744  -  []  156.84 227.33 0 top
NOREF#745  -  []  274.33 264.33 90 top
NOREF#746  -  []  156.57 185.63 0 top
NOREF#747  -  []  201.75 202.32 0 top
NOREF#748  -  []  201.41 167.9 90 top
NOREF#749  -  []  130.02 214.45 0 top
NOREF#750  -  []  178.97 271.91 90 top
NOREF#751  -  []  191.87 456.29 0 top
NOREF#752  -  []  235.17 216.75 90 top
NOREF#753  -  []  156.52 216.55 0 top
NOREF#754  -  []  93.68 156.59 0 top
NOREF#755  -  []  187.45 209.24 0 top
NOREF#756  -  []  232.11 231.4 0 top
NOREF#757  -  []  312.5 18.69 90 top
NOREF#758  -  []  277.25 180.62 0 top
NOREF#759  -  []  156.8 220.49 90 top
NOREF#760  -  []  164.95 272.86 90 top
NOREF#761  -  []  173.62 289.09 90 top
NOREF#762  -  []  152.25 282.59 90 top
NOREF#763  -  []  197.18 236.17 90 top
NOREF#764  -  []  181.03 207.69 90 top
NOREF#765  -  []  195.17 216.75 90 top
NOREF#766  -  []  269.72 275.77 0 top
NOREF#767  -  []  252.87 227.4 90 top
NOREF#768  -  []  153.18 277.69 90 top
NOREF#769  -  []  189.12 191.6 90 top
NOREF#770  -  []  237.71 172.86 0 top
NOREF#771  -  []  141.85 246.47 0 top
NOREF#772  -  []  187.01 458.49 0 top
NOREF#773  -  []  156.02 251.31 0 top
NOREF#774  -  []  235.05 278.82 0 top
NOREF#775  -  []  269.12 256.43 90 top
NOREF#776  -  []  248.94 221.73 0 top
NOREF#777  -  []  182.03 229.03 90 top
NOREF#778  -  []  209.55 237.49 0 top
NOREF#779  -  []  233.18 217.69 90 top
NOREF#780  -  []  203.04 236.5 90 top
NOREF#781  -  []  117.23 452.29 90 top
NOREF#782  -  []  229.84 213.7 90 top
NOREF#783  -  []  283.84 214.21 0 top
NOREF#784  -  []  266.83 256.75 0 top
NOREF#785  -  []  209.55 237.49 0 top
NOREF#786  -  []  152.25 218.02 0 top
NOREF#787  -  []  273.27 198.18 0 top
NOREF#788  -  []  256.98 265.11 90 top
NOREF#789  -  []  271.95 178.07 0 top
NOREF#790  -  []  135.15 263.21 0 top
NOREF#791  -  []  156.61 173.37 90 top
NOREF#792  -  []  162.87 16.49 0 top
NOREF#793  -  []  264.24 20.69 90 top
NOREF#794  -  []  267.8 264.99 90 top
NOREF#795  -  []  162.88 458.49 0 top
NOREF#796  -  []  288.54 260.64 90 top
NOREF#797  -  []  233.39 193.03 90 top
NOREF#798  -  []  220.95 204.09 90 top
NOREF#799  -  []  219.55 234.49 0 top
NOREF#800  -  []  134.43 292.23 0 top
NOREF#801  -  []  140.95 206.12 90 top
NOREF#802  -  []  182.81 246.81 0 top
NOREF#803  -  []  267.77 241.47 0 top
NOREF#804  -  []  272.72 197.6 0 top
NOREF#805  -  []  138.95 204.09 0 top
NOREF#806  -  []  272.13 284.66 0 top
NOREF#807  -  []  175.65 184.35 0 top
NOREF#808  -  []  205.38 226.23 0 top
NOREF#809  -  []  264.16 196.43 90 top
NOREF#810  -  []  238.64 233.37 90 top
NOREF#811  -  []  210.89 202.32 0 top
NOREF#812  -  []  163.97 205.9 0 top
NOREF#813  -  []  274.33 267.37 90 top
NOREF#814  -  []  191.53 173.37 90 top
NOREF#815  -  []  190.15 206.89 90 top
NOREF#816  -  []  119.48 456.29 90 top
NOREF#817  -  []  150.41 168.7 90 top
NOREF#818  -  []  135.11 261.22 90 top
NOREF#819  -  []  271.79 196.75 0 top
NOREF#820  -  []  192.72 252.78 0 top
NOREF#821  -  []  199.27 265.58 0 top
NOREF#822  -  []  199.27 214.21 0 top
NOREF#823  -  []  156.81 232.54 0 top
NOREF#824  -  []  277.37 251.6 90 top
NOREF#825  -  []  212.55 250.49 90 top
NOREF#826  -  []  155.05 274.25 0 top
NOREF#827  -  []  228.99 191.93 0 top
NOREF#828  -  []  274.39 276.17 90 top
NOREF#829  -  []  223.36 253.35 0 top
NOREF#830  -  []  233.6 226.96 0 top
NOREF#831  -  []  171.05 245.49 90 top
NOREF#832  -  []  251.36 18.69 90 top
NOREF#833  -  []  248.45 235.2 0 top
NOREF#834  -  []  275.96 228.6 90 top
NOREF#835  -  []  214.09 207.27 90 top
NOREF#836  -  []  236.61 233.37 90 top
NOREF#837  -  []  269.12 240.3 90 top
NOREF#838  -  []  187.45 269.24 0 top
NOREF#839  -  []  218.95 204.09 0 top
NOREF#840  -  []  213.65 239.15 0 top
NOREF#841  -  []  216.83 287.03 0 top
NOREF#842  -  []  279.4 260.64 90 top
NOREF#843  -  []  187.77 197.6 0 top
NOREF#844  -  []  276.52 216.55 0 top
NOREF#845  -  []  250.92 291.95 90 top
NOREF#846  -  []  326.72 389.27 90 top
NOREF#847  -  []  183.36 193.35 0 top
NOREF#848  -  []  169.52 207.27 90 top
NOREF#849  -  []  208.54 205.9 0 top
NOREF#850  -  []  199.4 268.95 0 top
NOREF#851  -  []  174.09 267.27 90 top
NOREF#852  -  []  156.57 193.35 0 top
NOREF#853  -  []  144.04 256.75 0 top
NOREF#854  -  []  228.35 223.79 90 top
NOREF#855  -  []  269.86 17.15 90 top
NOREF#856  -  []  207.04 299.09 0 top
NOREF#857  -  []  274.78 176.5 90 top
NOREF#858  -  []  226.83 196.75 0 top
NOREF#859  -  []  216.38 204.09 90 top
NOREF#860  -  []  277.18 176.17 90 top
NOREF#861  -  []  89.74 155.92 0 top
NOREF#862  -  []  289.52 272.86 90 top
NOREF#863  -  []  156.1 280.99 90 top
NOREF#864  -  []  195.17 276.75 90 top
NOREF#865  -  []  157.71 233.69 90 top
NOREF#866  -  []  266.01 184.91 90 top
NOREF#867  -  []  195.05 274.25 0 top
NOREF#868  -  []  226.43 282.49 90 top
NOREF#869  -  []  230.77 213.37 90 top
NOREF#870  -  []  188.78 184.35 0 top
NOREF#871  -  []  233.18 184.35 0 top
NOREF#872  -  []  168.42 265.58 0 top
NOREF#873  -  []  276.8 214.65 90 top
NOREF#874  -  []  250.92 231.95 90 top
NOREF#875  -  []  203.97 273.09 90 top
NOREF#876  -  []  255.24 261.55 90 top
NOREF#877  -  []  230.97 250.88 90 top
NOREF#878  -  []  231.46 227 0 top
NOREF#879  -  []  260.83 263.76 90 top
NOREF#880  -  []  226.96 256.43 90 top
NOREF#881  -  []  238.11 172.1 0 top
NOREF#882  -  []  89.74 135.6 0 top
NOREF#883  -  []  214.51 203.76 0 top
NOREF#884  -  []  275.92 250.88 90 top
NOREF#885  -  []  224.04 191.93 0 top
NOREF#886  -  []  151.24 253.03 90 top
NOREF#887  -  []  144.16 191.6 90 top
NOREF#888  -  []  199.72 223.79 90 top
NOREF#889  -  []  151.19 228.49 0 top
NOREF#890  -  []  192.13 214.25 0 top
NOREF#891  -  []  196.54 167 0 top
NOREF#892  -  []  155.96 168.6 90 top
NOREF#893  -  []  288.42 261.77 0 top
NOREF#894  -  []  196.7 197.85 90 top
NOREF#895  -  []  261.55 207.14 90 top
NOREF#896  -  []  150.97 190.88 90 top
NOREF#897  -  []  275.49 228.7 90 top
NOREF#898  -  []  163.97 260.64 90 top
NOREF#899  -  []  259.73 238.35 0 top
NOREF#900  -  []  272.25 282.59 0 top
NOREF#901  -  []  168.54 268.95 0 top
NOREF#902  -  []  196.61 173.37 90 top
NOREF#903  -  []  157.71 173.69 90 top
NOREF#904  -  []  186.16 286.14 90 top
NOREF#905  -  []  273.18 184.35 0 top
NOREF#906  -  []  209.55 237.49 90 top
NOREF#907  -  []  148.32 253.35 0 top
NOREF#908  -  []  230.97 179.57 90 top
NOREF#909  -  []  272.51 175.77 0 top
NOREF#910  -  []  196.7 193.03 90 top
NOREF#911  -  []  148.95 206.89 0 top
NOREF#912  -  []  146.83 191.93 0 top
NOREF#913  -  []  166.32 202.32 0 top
NOREF#914  -  []  214.38 264.09 0 top
NOREF#915  -  []  265.61 197.6 0 top
NOREF#916  -  []  89.76 144.42 90 top
NOREF#917  -  []  265.09 197.49 90 top
NOREF#918  -  []  193.18 184.35 0 top
NOREF#919  -  []  271.46 227 0 top
NOREF#920  -  []  173.45 244.35 0 top
NOREF#921  -  []  230.56 257.6 0 top
NOREF#922  -  []  149.29 285.22 0 top
NOREF#923  -  []  156.57 245.63 90 top
NOREF#924  -  []  239.4 260.64 90 top
NOREF#925  -  []  243.97 214.54 0 top
NOREF#926  -  []  276.57 245.63 0 top
NOREF#927  -  []  273.27 193.35 0 top
NOREF#928  -  []  288.42 204.78 90 top
NOREF#929  -  []  159.22 190.88 90 top
NOREF#930  -  []  161.44 184.35 0 top
NOREF#931  -  []  191.98 220.75 90 top
NOREF#932  -  []  224.16 191.6 90 top
NOREF#933  -  []  226.01 184.91 90 top
NOREF#934  -  []  159.27 267.82 90 top
NOREF#935  -  []  142.81 192.78 0 top
NOREF#936  -  []  181.55 207.14 90 top
NOREF#937  -  []  219.72 213.6 90 top
NOREF#938  -  []  227.43 284.11 90 top
NOREF#939  -  []  235.96 228.6 90 top
NOREF#940  -  []  155.96 228.6 90 top
NOREF#941  -  []  250.02 274.45 0 top
NOREF#942  -  []  271.95 238.07 0 top
NOREF#943  -  []  156.7 253.03 90 top
NOREF#944  -  []  237.25 251.93 0 top
NOREF#945  -  []  279.72 223.79 90 top
NOREF#946  -  []  290.89 266.13 0 top
NOREF#947  -  []  183.89 245.24 90 top
NOREF#948  -  []  206.32 209.17 0 top
NOREF#949  -  []  243.97 265.9 0 top
NOREF#950  -  []  233.94 196.75 0 top
NOREF#951  -  []  148.32 185.63 90 top
NOREF#952  -  []  155.17 272.17 0 top
NOREF#953  -  []  174.43 232.23 0 top
NOREF#954  -  []  143.36 198.18 0 top
NOREF#955  -  []  123.91 295.42 90 top
NOREF#956  -  []  289.52 270.32 90 top
NOREF#957  -  []  234.33 204.33 90 top
NOREF#958  -  []  171.05 232.28 90 top
NOREF#959  -  []  186.16 212.17 90 top
NOREF#960  -  []  275.05 274.25 0 top
NOREF#961  -  []  140.95 266.12 90 top
NOREF#962  -  []  229.12 191.6 90 top
NOREF#963  -  []  133.95 281.02 90 top
NOREF#964  -  []  189.55 248.99 90 top
NOREF#965  -  []  294.09 267.27 90 top
NOREF#966  -  []  147.77 181.47 0 top
NOREF#967  -  []  273.56 233.37 90 top
NOREF#968  -  []  139.55 294.49 0 top
NOREF#969  -  []  225.09 257.49 90 top
NOREF#970  -  []  275.17 216.75 90 top
NOREF#971  -  []  235.56 175.77 0 top
NOREF#972  -  []  270.77 283.79 90 top
NOREF#973  -  []  195.05 283.39 0 top
NOREF#974  -  []  178.35 207.01 0 top
NOREF#975  -  []  188.81 195.7 90 top
NOREF#976  -  []  243.97 267.5 90 top
NOREF#977  -  []  248.54 264.45 90 top
NOREF#978  -  []  141.43 285.38 90 top
NOREF#979  -  []  286.32 262.32 0 top
NOREF#980  -  []  283.84 208.62 0 top
NOREF#981  -  []  203.97 202.09 0 top
NOREF#982  -  []  178.35 271.84 0 top
NOREF#983  -  []  145.42 226.99 90 top
NOREF#984  -  []  210.02 274.45 0 top
NOREF#985  -  []  276.81 172.54 0 top
NOREF#986  -  []  159.27 208.62 0 top
NOREF#987  -  []  203.97 205.9 0 top
NOREF#988  -  []  273.94 256.75 0 top
NOREF#989  -  []  80.49 155.57 0 top
NOREF#990  -  []  185.42 274.72 90 top
NOREF#991  -  []  240.11 18.69 0 top
NOREF#992  -  []  219.55 180.49 90 top
NOREF#993  -  []  131.05 292.28 90 top
NOREF#994  -  []  206.32 202.32 0 top
NOREF#995  -  []  186.43 296.46 90 top
NOREF#996  -  []  269.72 286.19 0 top
NOREF#997  -  []  242.85 297.22 0 top
NOREF#998  -  []  186.01 190.88 90 top
NOREF#999  -  []  227.43 218.27 90 top
NOREF#1000  -  []  235.05 214.25 0 top
NOREF#1001  -  []  147.99 178.35 0 top
NOREF#1002  -  []  165.38 226.23 0 top
NOREF#1003  -  []  195.17 281.32 90 top
NOREF#1004  -  []  216 396.29 0 top
NOREF#1005  -  []  242.57 231.95 0 top
NOREF#1006  -  []  228.32 245.63 0 top
NOREF#1007  -  []  288.42 265.58 0 top
NOREF#1008  -  []  181.22 76.69 90 top
NOREF#1009  -  []  234.07 251.6 90 top
NOREF#1010  -  []  241.75 202.32 0 top
NOREF#1011  -  []  209.55 237.49 0 top
NOREF#1012  -  []  181.6 294.14 0 top
NOREF#1013  -  []  272.63 173.69 0 top
NOREF#1014  -  []  178.83 292.23 0 top
NOREF#1015  -  []  248.54 262.09 0 top
NOREF#1016  -  []  146.83 196.75 0 top
NOREF#1017  -  []  273.6 286.96 0 top
NOREF#1018  -  []  229.84 273.7 90 top
NOREF#1019  -  []  131.26 184.35 0 top
NOREF#1020  -  []  208.54 202.09 0 top
NOREF#1021  -  []  231.19 228.49 0 top
NOREF#1022  -  []  195.56 235.77 0 top
NOREF#1023  -  []  231.76 167.33 0 top
NOREF#1024  -  []  163.4 236.38 0 top
NOREF#1025  -  []  157.59 235.77 0 top
NOREF#1026  -  []  297.39 456.29 0 top
NOREF#1027  -  []  224.04 245.96 0 top
NOREF#1028  -  []  258.83 292.23 0 top
NOREF#1029  -  []  131.65 233.3 90 top
NOREF#1030  -  []  213.75 452.29 90 top
NOREF#1031  -  []  255.65 184.35 0 top
NOREF#1032  -  []  196.8 220.49 90 top
NOREF#1033  -  []  229.84 224.11 0 top
NOREF#1034  -  []  278.91 172.21 90 top
NOREF#1035  -  []  270.86 82.65 0 top
NOREF#1036  -  []  264.16 251.6 90 top
NOREF#1037  -  []  266.43 282.49 90 top
NOREF#1038  -  []  83.04 144.22 90 top
NOREF#1039  -  []  153.6 222.39 0 top
NOREF#1040  -  []  259.55 234.49 0 top
NOREF#1041  -  []  276.02 257.6 0 top
NOREF#1042  -  []  192.72 257.6 0 top
NOREF#1043  -  []  157.04 184.35 0 top
NOREF#1044  -  []  187.3 286.19 0 top
NOREF#1045  -  []  248.54 208.95 0 top
NOREF#1046  -  []  171.65 293.3 90 top
NOREF#1047  -  []  267.9 265.84 90 top
NOREF#1048  -  []  249.52 212.86 90 top
NOREF#1049  -  []  163.84 273.41 90 top
NOREF#1050  -  []  179.55 240.49 90 top
NOREF#1051  -  []  220.83 263.76 90 top
NOREF#1052  -  []  275.17 272.17 0 top
NOREF#1053  -  []  243.92 289.94 0 top
NOREF#1054  -  []  210.89 269.17 0 top
NOREF#1055  -  []  237.25 256.75 0 top
NOREF#1056  -  []  258.35 209.04 0 top
NOREF#1057  -  []  186.16 226.14 90 top
NOREF#1058  -  []  288.54 262.09 0 top
NOREF#1059  -  []  159.27 214.21 0 top
NOREF#1060  -  []  188.44 253.03 90 top
NOREF#1061  -  []  129.05 232.28 0 top
NOREF#1062  -  []  147.77 236.37 0 top
NOREF#1063  -  []  277.37 240.3 90 top
NOREF#1064  -  []  270.98 244.35 0 top
NOREF#1065  -  []  239.4 274.54 0 top
NOREF#1066  -  []  191.24 253.03 90 top
NOREF#1067  -  []  270.41 168.7 90 top
NOREF#1068  -  []  199.27 207.82 90 top
NOREF#1069  -  []  204.61 234.24 90 top
NOREF#1070  -  []  277.74 226.35 90 top
NOREF#1071  -  []  183.49 187.06 90 top
NOREF#1072  -  []  203.04 176.5 90 top
NOREF#1073  -  []  153.27 258.18 0 top
NOREF#1074  -  []  270.15 206.89 90 top
NOREF#1075  -  []  182.81 192.78 0 top
NOREF#1076  -  []  158.11 232.1 0 top
NOREF#1077  -  []  144.04 185.96 0 top
NOREF#1078  -  []  203.97 270.55 90 top
NOREF#1079  -  []  235.58 262.67 90 top
NOREF#1080  -  []  173.78 267.01 0 top
NOREF#1081  -  []  271.19 223.92 0 top
NOREF#1082  -  []  244.61 234.89 90 top
NOREF#1083  -  []  218.95 261.55 0 top
NOREF#1084  -  []  148.99 191.93 0 top
NOREF#1085  -  []  239.06 178.07 0 top
NOREF#1086  -  []  196.79 171.3 0 top
NOREF#1087  -  []  258.95 268.91 0 top
NOREF#1088  -  []  272.72 192.78 0 top
NOREF#1089  -  []  187.8 204.99 90 top
NOREF#1090  -  []  233.98 238.07 0 top
NOREF#1091  -  []  266.16 286.14 90 top
NOREF#1092  -  []  173.78 207.01 0 top
NOREF#1093  -  []  203.84 267.82 90 top
NOREF#1094  -  []  221.03 207.69 90 top
NOREF#1095  -  []  203.97 210.55 90 top
NOREF#1096  -  []  154.63 282.42 0 top
NOREF#1097  -  []  236.7 257.85 90 top
NOREF#1098  -  []  180.83 265.79 90 top
NOREF#1099  -  []  159.27 260.97 90 top
NOREF#1100  -  []  283.97 270.55 90 top
NOREF#1101  -  []  236.57 253.35 0 top
NOREF#1102  -  []  146.88 280.75 90 top
NOREF#1103  -  []  148.35 283.79 90 top
NOREF#1104  -  []  232.25 222.59 0 top
NOREF#1105  -  []  243.84 201.77 0 top
